# Altium PCB QI9-2604-A01_.PcbDoc (part 2 of 3)
Units mm, origin at the board's own origin, x right, y up, seen from the top; angles counter-clockwise.
Board outline 152.4 x 101.6 mm, 2 copper layers (Top Layer, Bottom Layer); 241 components, 189 nets, 865 pads, 150 vias.
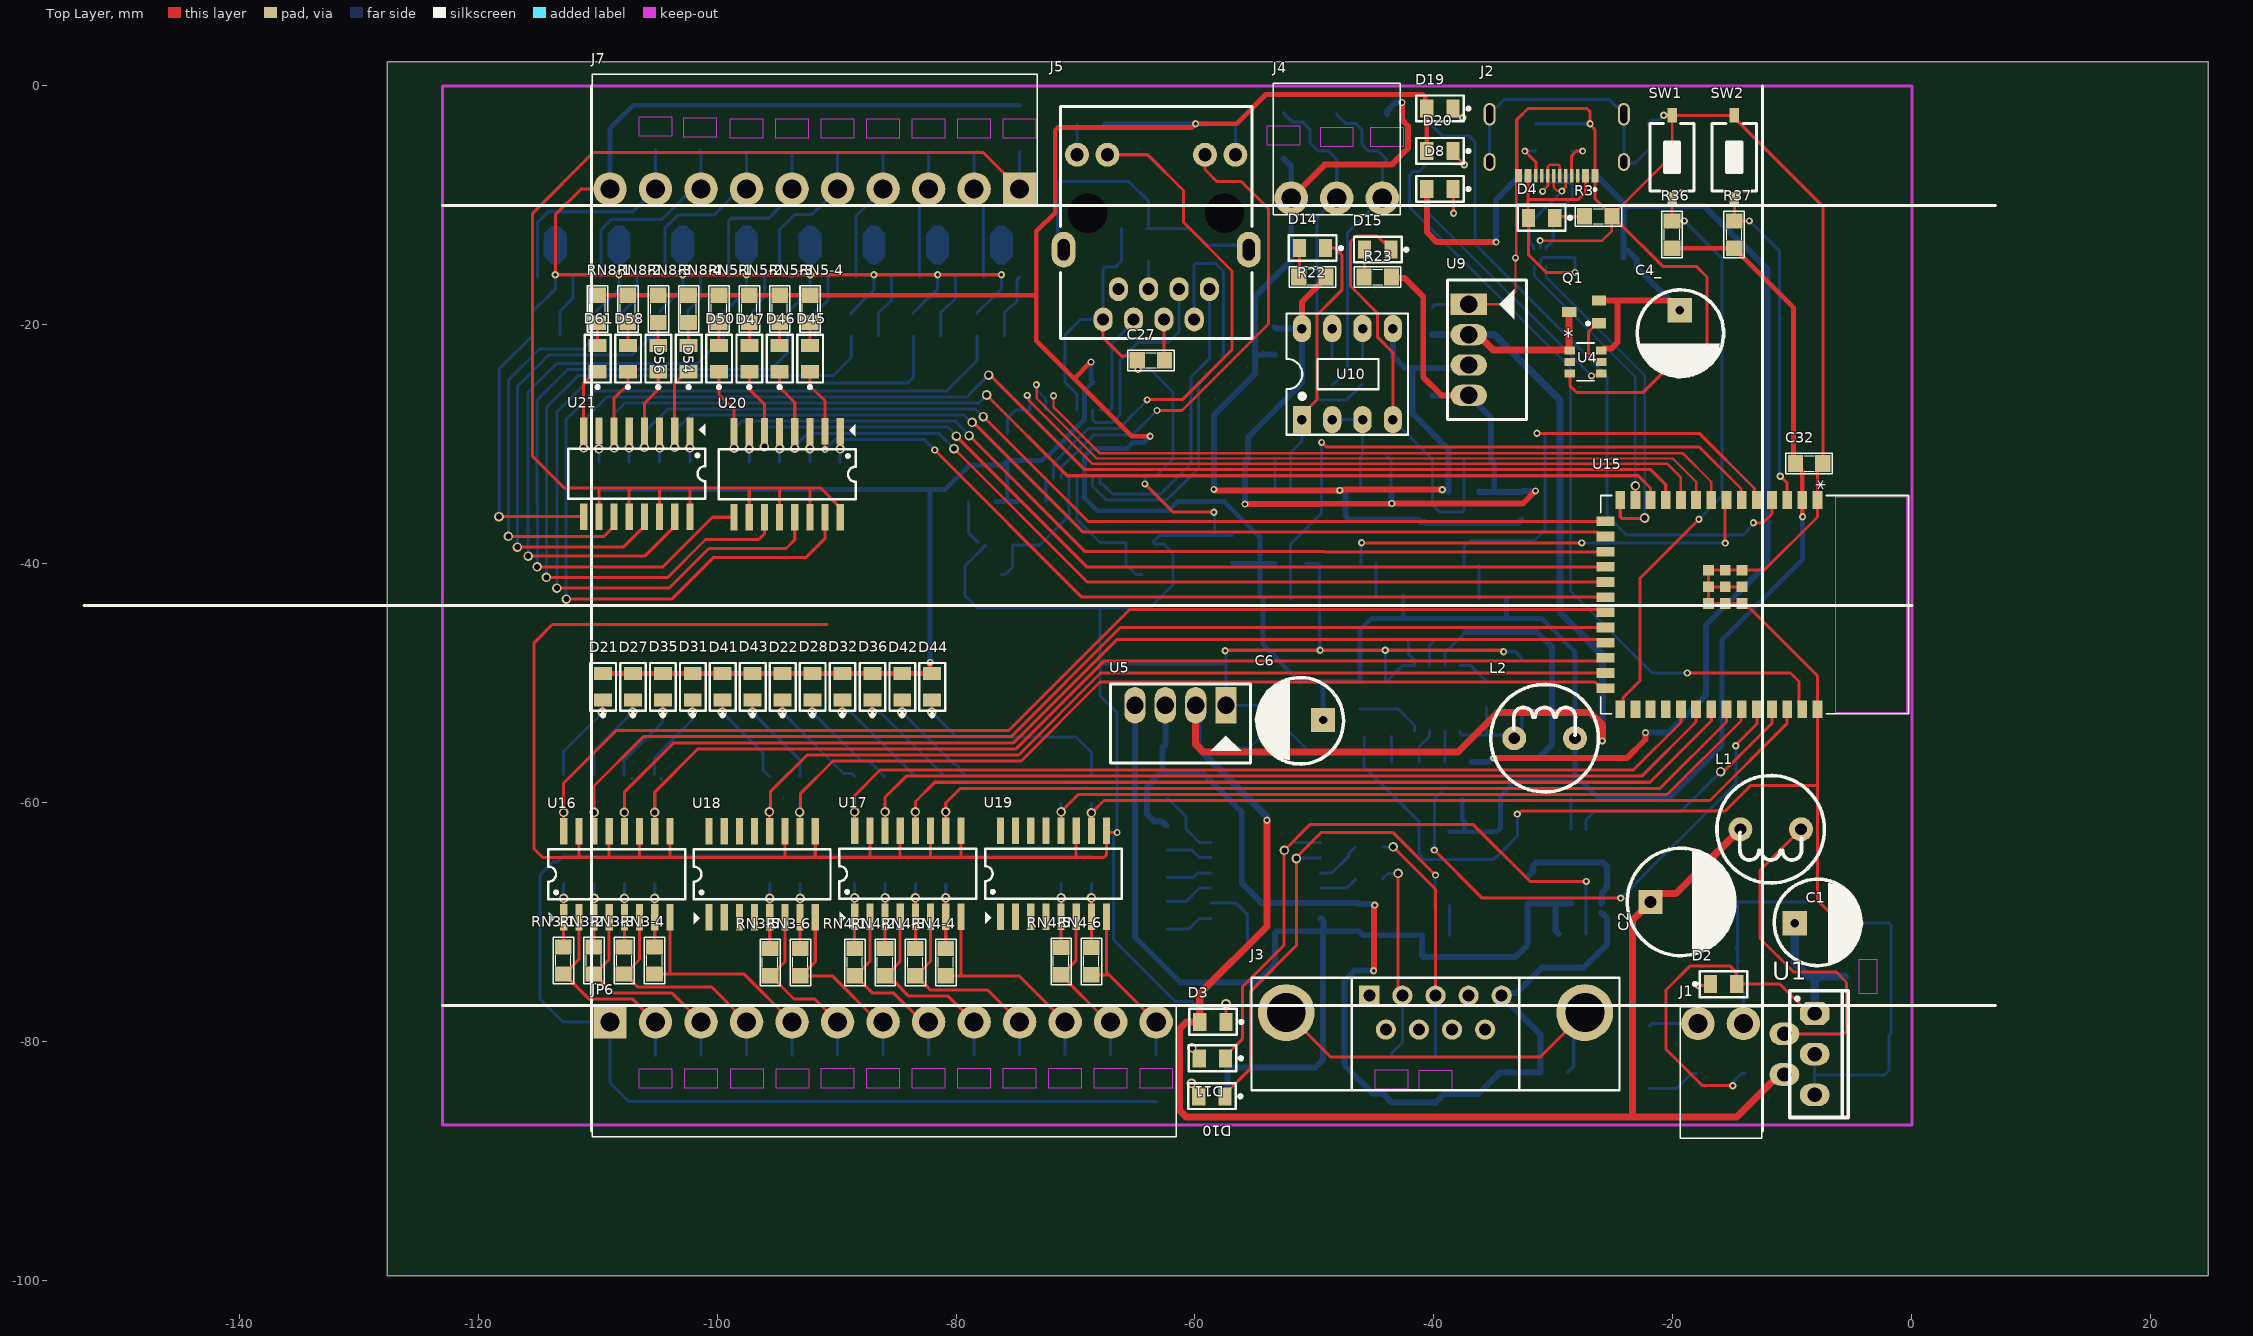
[diagram p0: Top Layer view]

## Via types
v1: diameter 0.8, hole 0.5, Top Layer to Bottom Layer, 76 vias
v2: diameter 0.6, hole 0.3, Top Layer to Bottom Layer, 74 vias

## Nets (pads, with @x,y where several pads share a name; then routed paths per layer and width w, separated by ;. In a path a pad name is that pad's centre, name@x,y a point inside that pad or via, vN(x,y) a via of type N, cw(c..) or ccw(c..) an arc to the next point about the centre after c; other vN are vias at no path point) (continued)
GND: (continued)
  Bottom Layer w0.254: C26.1@-78.964,-34.777 -78.964,-37.413 C31.2@-78.151,-38.227 ; C31.2@-77.549,-38.434 -77.549,-38.497 -79.248,-40.196 -79.248,-42.672 -78.232,-43.688 -67.945,-43.688 ; C25.2@-70.866,-24.828 -69.891,-25.803 U14.17@-69.891,-27.122 ; C25.2@-70.866,-24.765 -70.866,-20.828 -69.596,-19.558 J5.8@-67.686,-19.558 -67.686,-15.362 -67.501,-15.176 -66.675,-15.176 -66.167,-14.668 C28.1@-66.167,-14.605 C30.1@-66.167,-11.938 ; C24.1@-65.659,-32.639 -64.262,-32.639 ; v2(-64.77,-23.749) -63.73,-23.749 -61.849,-25.63 -61.849,-31.242 -63.246,-32.639 -64.262,-32.639 ; v2(-64.194,-33.32) -64.194,-32.707 -64.262,-32.639 ; R2.1@-59.652,-78.186 -59.652,-77.254 -60.273,-76.633 -61.67,-76.633 -66.802,-71.501 -66.802,-62.825 -66.523,-62.546 v2(-66.523,-62.503) -66.523,-52.476 -67.945,-51.054 -67.945,-48.387 ; v2(-58.42,-35.687) -58.354,-35.753 -58.354,-37.531 -58.235,-37.65 C23.2@-56.845,-37.65 ; -58.354,-37.65 -62.843,-37.65 -62.849,-37.655 -62.992,-37.655 -63.5,-38.163 C29.2@-63.5,-38.227 -63.395,-38.332 -62.633,-38.332 -61.849,-39.116 -61.849,-41.783 -63.754,-43.688 -67.945,-43.688 ; v2(-57.474,-47.288) -57.407,-47.354 -57.407,-47.956 -57.404,-47.959 -57.404,-48.387 ; U5.1@-57.404,-51.853 -57.404,-48.387 ; U13.5@-50.749,-39.97 -49.714,-39.97 -49.565,-40.119 -49.565,-44.596 -49.582,-44.613 -49.556,-44.639 -49.556,-47.218 v2(-49.53,-47.244) ; -45.847,-55.753 -45.847,-56.998 -41.239,-61.606 U8.5@-41.239,-62.431 -41.239,-64.334 -40.803,-64.77 -35.036,-64.77 C17.2@-34.762,-64.497 -34.699,-64.497 -33.02,-62.818 v2(-33.02,-60.96) ; v2(-44.069,-47.244) -44.039,-47.274 R13.1@-44.039,-49.868 ; R13.1@-43.975,-49.868 -42.648,-48.54 U3.5@-41.626,-48.54 -41.626,-48.09 -42.134,-47.582 R10.2@-42.134,-46.312 ; C19.2@-40.132,-18.542 -39.878,-18.288 U9.1@-37.084,-18.288 ; v2(-34.163,-47.371) -33.2,-47.371 D9.1@-32.609,-47.962 ; R4.2@-31.494,-3.175 R5.2@-28.461,-3.175 v2(-26.924,-3.175) ; C7.1@-22.098,-3.175 -21.802,-2.879 -21.167,-2.879 v2(-20.757,-2.469) ; C2.2@-16.51,-68.326 -14.605,-68.326 ; -14.732,-72.136 -14.605,-72.263 R1.1@-14.605,-75.311 -14.097,-75.819 J1.2@-14.097,-78.486 ; -14.605,-72.136 -14.605,-68.326 ; U1.5@-8.128,-84.455 -8.128,-82.755 ; U1.3@-8.128,-81.055 -8.128,-82.755 ; C1.2@-5.983,-70.086 -1.901,-70.086 -1.753,-70.234 D5.2@-1.753,-74.549 -1.753,-79.35 D6.1@-1.778,-79.375 -1.905,-79.502 -1.905,-82.423 -2.286,-82.804 -8.079,-82.804 -8.128,-82.755 ; C1.2@-5.983,-69.578 -6.296,-69.265 -6.536,-69.505 -6.564,-69.505 -7.743,-68.326 -14.605,-68.326 ; -67.945,-48.387 -57.404,-48.387 ; -67.945,-48.387 -67.945,-43.688

## Text inside footprints (layer, text, board x,y; h text height)
U3: Bottom Overlay "*" at -37.384,-54.56 h1.27 r270; Bottom 3D Body "*" at -38.565,-53.195 h1.27 r270
U4: Top Overlay "*" at -29.191,-21.631 h1.27; Top 3D Body "*" at -28.118,-23.012 h1.27
U6: Bottom Overlay "8" at -29.505,-69.789 h0.51 r90; Bottom Overlay "1" at -29.607,-60.823 h0.51 r90
U8: Bottom Overlay "8" at -37.734,-61.068 h0.51 r270; Bottom Overlay "1" at -37.633,-70.034 h0.51 r270
U11: Bottom Overlay "1" at -35.154,-41.571 h0.51 r270; Bottom Overlay "8" at -35.256,-32.605 h0.51 r270
U12: Bottom Overlay "8" at -43.892,-32.447 h0.51 r270; Bottom Overlay "1" at -43.79,-41.413 h0.51 r270
U13: Bottom Overlay "8" at -54.254,-41.333 h0.51 r90; Bottom Overlay "1" at -54.356,-32.367 h0.51 r90
U15: Top Overlay "*" at -8.529,-32.982 h1.27 r270; Top 3D Body "*" at -8.529,-35.751 h1.27 r270